# Altium PCB IC Power SimCom.PcbDoc (part 2 of 3)
Units mm, origin at the board's own origin, x right, y up, seen from the top; angles counter-clockwise.
Board outline 110 x 110 mm, 2 copper layers (Top Layer, Bottom Layer); 161 components, 109 nets, 599 pads, 845 vias.
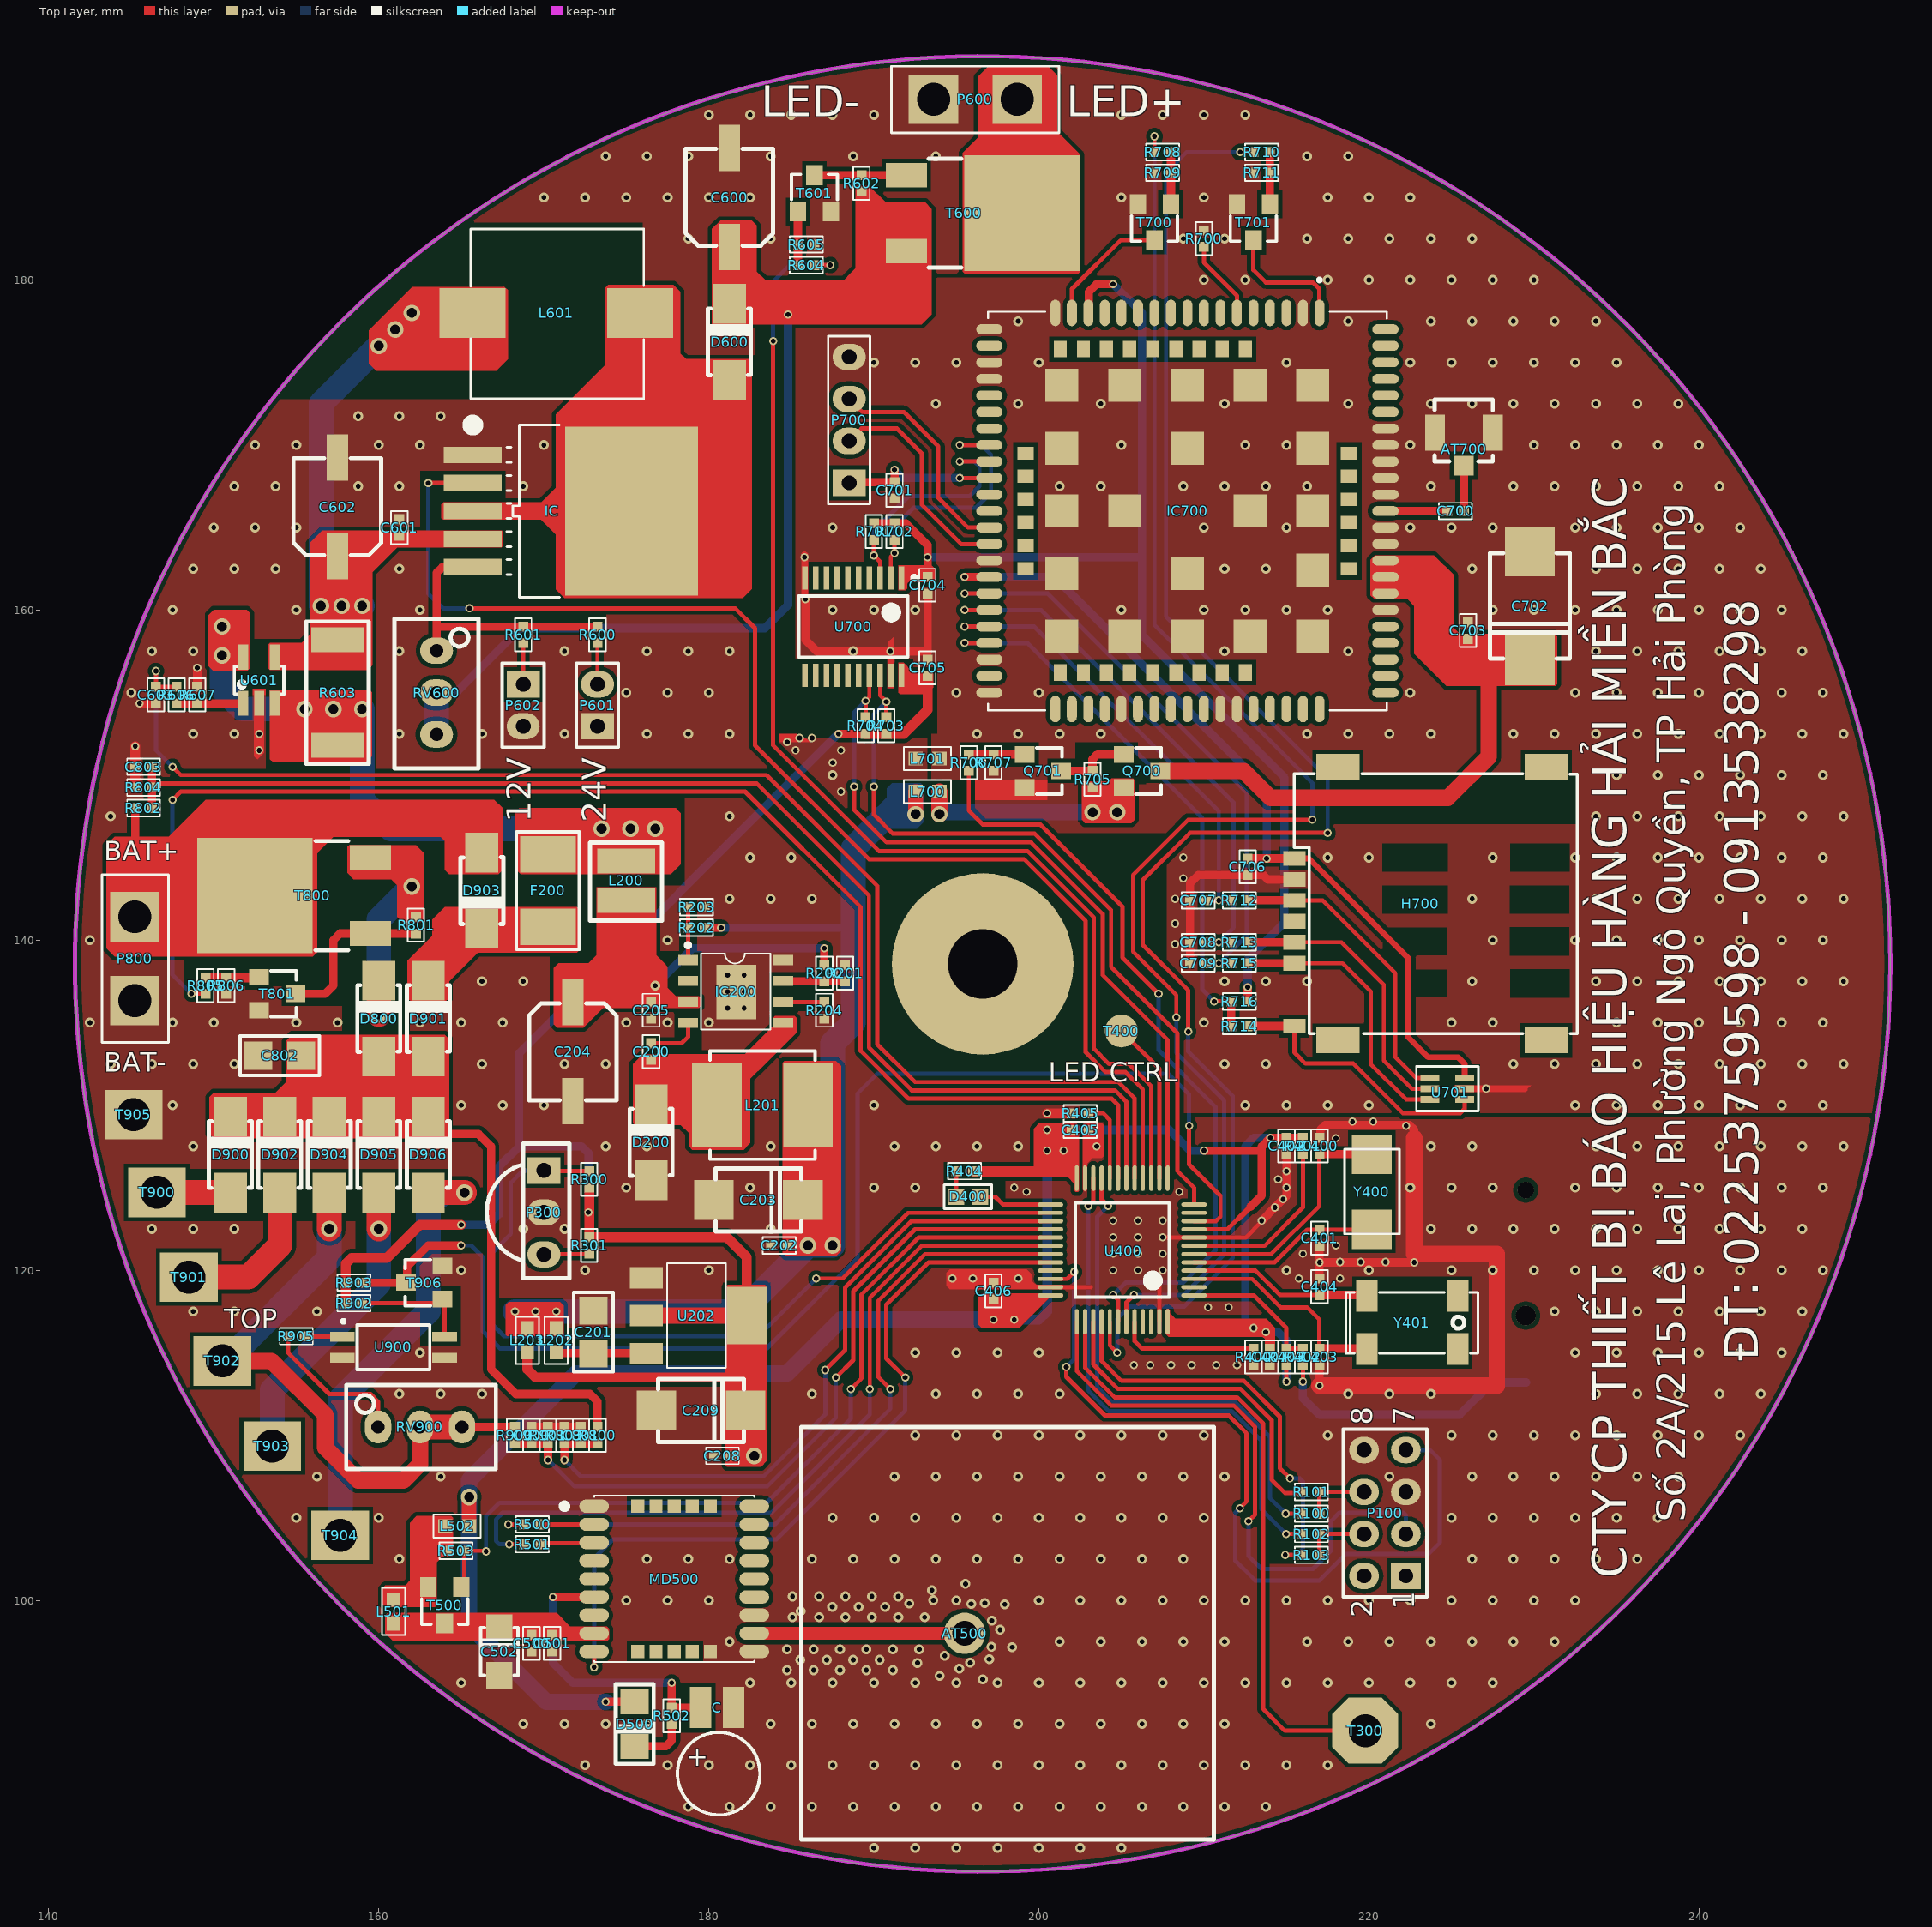
[diagram p0: Top Layer view]

## Part data (continued)
U400: "STM32L ARM-based EnergyLite 32-bit MCU, 128 kB Flash, 16 kB Internal RAM, -40 to +85°C Temperature, 32-pin LQFP, Tray", ComponentLink1Description="Manufacturer URL", ComponentLink1URL=http://www.st.com/, ComponentLink2Description="STM32L151/152 Datasheet", ComponentLink2URL=http://www.st.com/internet/com/TECHNICAL_RESOURCES/TECHNICAL_LITERATURE/DATASHEET/CD00277537.pdf, ComponentLink3Description="STM32 L1 Family Web Page", ComponentLink3URL=http://www.st.com/internet/mcu/subclass/1376.jsp, DatasheetVersion="rev6, Jan-2012", MPN=STM32L151CBT6, PackageDescription="48-Pin Low-Profile Quad Flat Pack, 7 x 7 mm Body, 0.5 mm Pitch (LQFP48)", PackageReference=LQFP48, PackageVersion="rev13, Apr-2011"
U601: "IC Current Monitor Regulator 0.5% SOT-23-5", MPN=INA138
U700: library part TC7MPB9307FK, "IC Logic Convert 1.8V 3.3V 20-VSSOP", Manufacturer="Texas Instruments", MPN=TC7MPB9307FT(EL), Operating Temperature="-40°C ~ 85°C", Package / Case="20-TSSOP (0.173\", 4.40mm Width)", Supplier Device Package=20-TSSOP, Supplier Part Number 1=296-21527-2-ND, Voltage - Supply="1.2 V ~ 3.6 V, 1.65 V ~ 5.5 V", Category="Integrated Circuits (ICs)", ComponentLink1Description=http://www.ti.com/lit/ds/symlink/txb0108.pdf, ComponentLink1URL=http://www.ti.com/lit/ds/symlink/txb0108.pdf, Data Rate=100Mbps, Differential - Input:Output=No/No, Input Type=Logic, Logic Function="Translator, Bidirectional", Mounting type="Surface Mount", Number of Bits=8, Number of Channels=8, Number of Outputs/Channel=1, Output Type=Logic, Packaging="Tape & Reel (TR)", Pricing 1="2000=0.9 (USD)", Propagation Delay (Max)=4ns, RoHS="RoHS Compliant", Stock 1=18000, Supplier 1=Digi-Key
U701: library part SMF05C, "TVS Diode Array For ESD and Latch-Up Protection", Breakdown Voltage Max=7.2, Breakdown Voltage Min=6.2, Clamping Voltage Vc Max=21.5, Manufacturer="ON SEMICONDUCTOR", MPN=SMF05CT2G, Peak Pulse Current Ippm=8, Reverse Stand-Off Voltage Vrwm=13, Supplier Part Number 1=45J2265, ComponentLink1Description=http://www.onsemi.com/pub/Collateral/SMF05C-D.PDF, ComponentLink1URL=http://www.onsemi.com/pub/Collateral/SMF05C-D.PDF, No. of Pins=6, Pricing 1="6000=0.102, 15000=0.093, 30000=0.087, 75000=0.078, 150000=0.075 (USD)", RoHS=YES, Stock 1=0, Supplier 1=Newark, TVS Polarity=Unidirectional, Value1=NC
U900: library part OPTOISO1, "Optoisolator Transistor Output 3750Vrms 1 Channel 4-SOP", MFR="Vishay Semiconductor Opto Division", Category="Optoisolators - Transistor, Photovoltaic Output", Component Type=IC, MPN=EL817
Y400: library part XTAL, "Crystal 8Mhz 20pF SMD 5032", LatestRevisionDate=17-Jul-2002, LatestRevisionNote="Re-released for DXP Platform.", PackageDescription="Crystal, Thru-Hole; 2 Leads; Body 3.1 x 8.2 mm (Dia.xH)", PackageReference=R38, Published=8-Jun-2000, Publisher="Altium Limited"
Y401: library part ABS25-32768-6-T, "CRYSTAL 32.768KHZ 6PF SMD", ESR (Equivalent Series Resistance)="50 kOhm", Frequency=32.768kHz, Frequency Stability=-, Frequency Tolerance=±20ppm, Load Capacitance=6pF, Manufacturer="Abracon Corporation", Manufacturer Part Number=ABS25-32.768KHZ-6-T, Operating Mode=Fundamental, Operating Temperature="-40°C ~ 85°C", Package / Case="4-SOJ, 5.50mm pitch", Supplier Part Number 1=535-10240-2-ND, Category="Crystals and Oscillators", ComponentLink1Description=http://www.abracon.com/Resonators/abs25.pdf, ComponentLink1URL=http://www.abracon.com/Resonators/abs25.pdf, Height="0.098\" (2.50mm)", Mounting type="Surface Mount", Packaging="Tape & Reel (TR)", Pricing 1="3000=0.285, 6000=0.2755, 15000=0.266 (USD)", Ratings=-, RoHS="RoHS Compliant", Size / Dimension="0.315\" L x 0.150\" W (8.00mm x 3.80mm)", Stock 1=51000, Supplier 1=Digi-Key, Type="kHz Crystal (Tuning Fork)"

## Free pads (board coordinates)
  round 11 hole 4.2: 0(196.596,138.557)

## Via types
v1: diameter 0.6, hole 0.3, Top Layer to Bottom Layer, tented both sides, 654 vias
v2: diameter 0.5, hole 0.3, Top Layer to Bottom Layer, tented both sides, 164 vias
v3: diameter 1, hole 0.6, Top Layer to Bottom Layer, tented both sides, 27 vias

## Nets (pads, with @x,y where several pads share a name; then routed paths per layer and width w, separated by ;. In a path a pad name is that pad's centre, name@x,y a point inside that pad or via, vN(x,y) a via of type N, cw(c..) or ccw(c..) an arc to the next point about the centre after c; other vN are vias at no path point)
1.8V: C704.2 IC700.15 R701.2 R702.2 R716.2 U700.1 | length 70.4
  Top Layer w0.5: R701.2@190,165.25 R702.2@191.25,165.25 191.95,165.25 193.25,163.95 C704.2@193.25,162 ; IC700.15@203,178 203.019,178.019 203.019,179.269 203.5,179.75 v2(204.5,179.75) ; R716.2@212.65,136.287 v2(212.65,137.15)
  Bottom Layer w0.5: v2(193.25,163.2) 206.25,163.2 ; v2(204.5,179.75) 206.25,178 206.25,163.2 ; v2(212.65,137.15) 212.65,138.85 214.875,141.075 214.875,149.85 206.362,158.363 206.25,158.475 206.25,163.2
3.3V: C208.2 C209.1 C402.2 C405.2 C406.2 C407.2 C705.2 D500.1 L203.2 L502.1 R300.2 R301.1 R401.2 R403.1 R404.1 R703.2 R704.2 R902.2 R903.2 U202.2 U400.9 U400.24 U400.36 U400.48 U700.20 | length 236.5
  Top Layer w0.254: U400.9@209.4,122.475 211.425,122.475 212.1,123.15 ; v2(215,113.25) R403.1@215,114.25
  Top Layer w0.35: 212.125,123.15 212.825,123.85
  Top Layer w0.5: v2(173.75,93.85) D500.1@175.5,93.85 ; v2(187.85,152.5) R704.2@189.5,152.5 ; v2(210,127.25) 213.45,127.25 213.5,127.2 ; 212.825,123.85 213.5,124.525 213.5,127.2 ; R401.2@216,128.025 C402.2@215,128.025 v2(214.025,128.025) 213.5,127.5 213.5,127.2
  Top Layer w0.6: R902.2@158,118 R903.2@158,119.25 158,120.399 158.351,120.75 160.5,120.75 162.5,122.75 v2(165,122.75) ; L203.2@169,115.027 169,114 169.5,113.5 183,113.5 ; R300.2@172.75,125 R301.1@172.75,122 181.1,122 182.298,120.802 U202.2@182.298,117.25 ; R704.2@189.5,152.5 R703.2@190.75,152.5 191.8,152.5 193.25,153.95 C705.2@193.25,156 ; R404.1@196,126 200.5,126 ; 208.5,116.75 213.648,116.75 214,116.399 C407.2@214,115.25
  Top Layer w0.9: L502.1@165.475,104.5 v3(165.475,106.25)
  Top Layer w1: U202.2@176.202,117.25 U202.2@182.298,117.25
  Bottom Layer w0.5: v2(165,122.75) 166.65,122.75 167.3,123.4 167.3,126.3 168.5,127.5 ; v2(172.7,123.5) 172.7,127.1 172.3,127.5 168.5,127.5 ; v2(187.85,152.5) 168.5,133.15 168.5,127.5 ; v2(200.5,128.5) 207.9,128.5 209.15,127.25 v2(210,127.25) ; v2(213,116.5) 212.5,117 212.5,127.5 213.025,128.025 v2(214.025,128.025) ; v2(213.75,116.25) 214.5,116.25 215,115.75 v2(215,113.25)
  Bottom Layer w0.6: v2(197.25,117) v2(198.5,117) 200,117 200.5,117.5 v2(200.5,127.25) ; v2(200.5,128.5) v2(200.5,127.25) ; v2(201.5,127.25) v2(200.5,127.25)
  Bottom Layer w1: v2(173.75,93.85) 170.15,93.85 165.475,98.525 v3(165.475,106.25) 165.475,107.275 171.95,113.75 184.75,113.75 188,117 v2(197.25,117) ; v3(182.75,108.75) 182.75,113.7
Debug.USART3.RX: P100.4 R102.1 R103.1 | length 4
  Top Layer w0.254: R103.1@217,102.75 R102.1@217,104.02 P100.4@219.7,104.02
Debug.USART3.TX: P100.6 R100.1 R101.1 | length 4
  Top Layer w0.254: R100.1@217,105.25 R101.1@217,106.56 P100.6@219.7,106.56

## Text inside footprints (layer, text, board x,y; h text height)
C: Top Overlay "+" at 179.992,91.35 h2 r180
P100: Top Overlay "2" at 220.208,98.94 h1.27 r90; Top Overlay "1" at 222.748,99.448 h1.27 r90; Top Overlay "7" at 222.748,110.624 h1.27 r90; Top Overlay "8" at 220.208,110.624 h1.27 r90